# Altium PCB slave.PcbDoc (part 7 of 8)
Units mm, origin at the board's own origin, x right, y up, seen from the top; angles counter-clockwise.
Board outline 160 x 100 mm, 6 copper layers (Top, FUSED_VBAT-, Signals1, Signals2, SUPPLY, Bottom), stack 1.67 mm thick; 597 components, 381 nets, 1695 pads, 3029 vias.
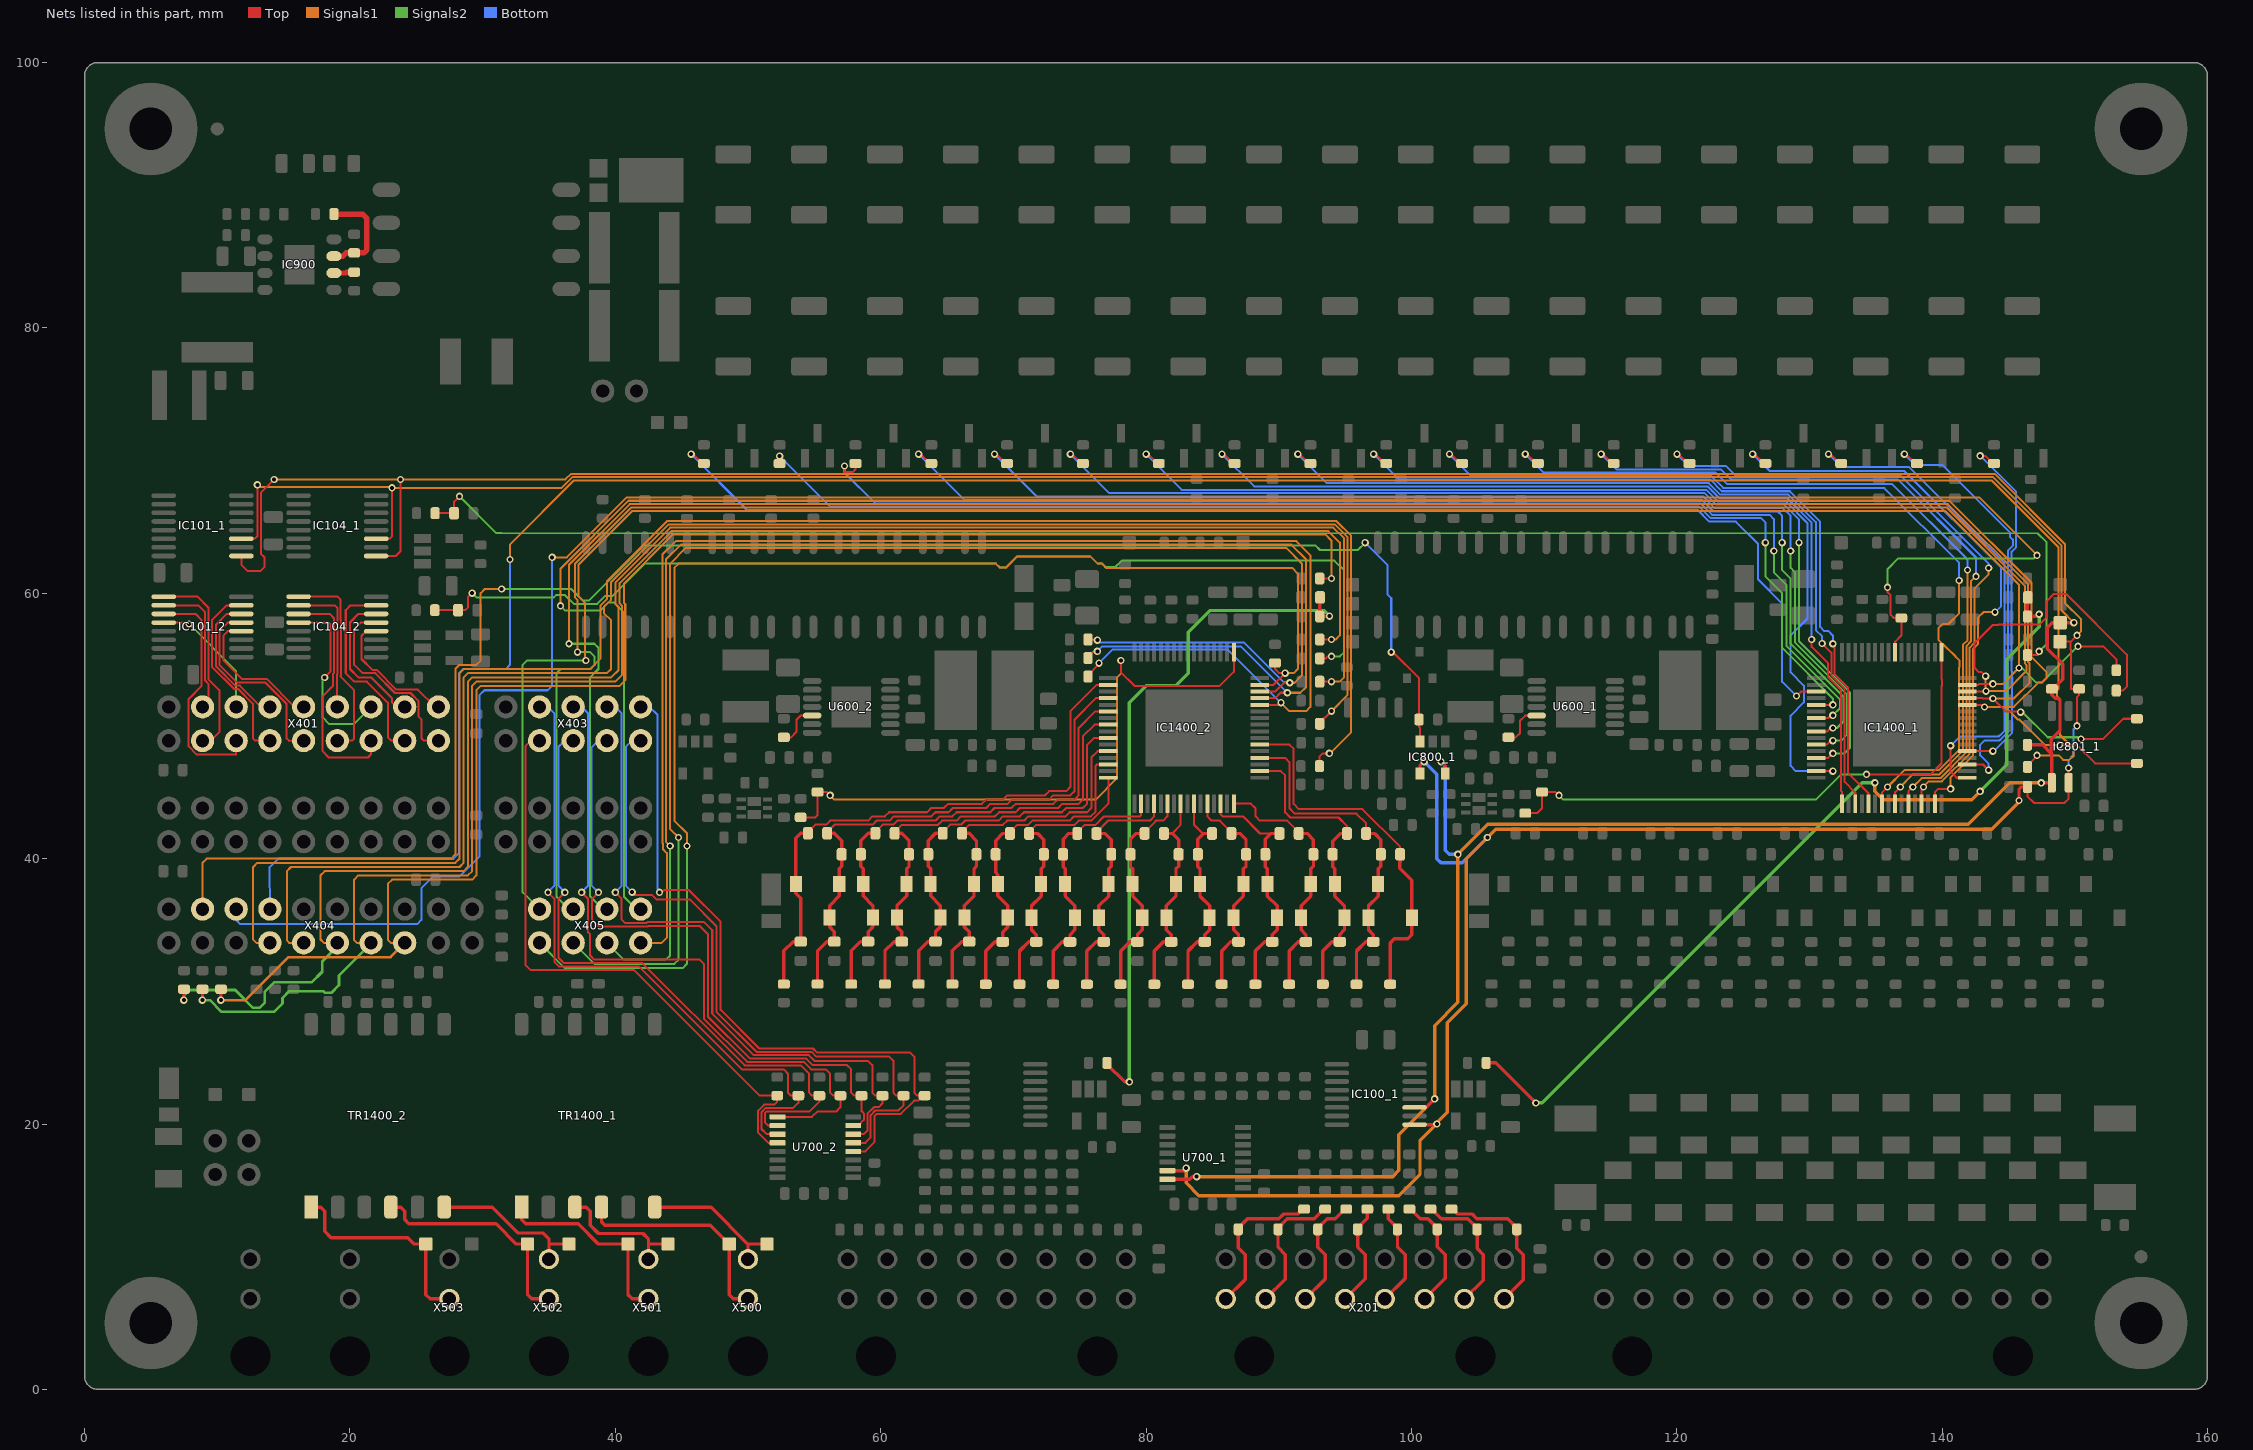
[diagram p10: the nets of this part, all layers, seen from the top]

## Via types
v1: diameter 0.55, hole 0.3, Top to Bottom, tented both sides, 2991 vias
v2: diameter 0.75, hole 0.5, Top to Bottom, tented both sides, 22 vias
v3: diameter 0.65, hole 0.4, Top to Bottom, tented both sides, 16 vias

## Nets (pads, with @x,y where several pads share a name; then routed paths per layer and width w, separated by ;. In a path a pad name is that pad's centre, name@x,y a point inside that pad or via, vN(x,y) a via of type N, cw(c..) or ccw(c..) an arc to the next point about the centre after c; other vN are vias at no path point) (continued)
PRIMARY-GPIO5-OPT: R1416_1.1 X404.13 | length 185.9
  Top w0.152: R1416_1.1@146.433,46.915 146.433,47.015 147.161,47.744 v1(147.161,47.784)
  Signals1 w0.152: v1(32.067,62.547) 32.067,63.691 36.876,68.499 143.748,68.499 148.76,63.487 148.76,52.77 148.671,52.681 148.671,52.221 148.887,52.005 148.887,49.318 149.906,48.299 149.843,48.299 149.906,48.236 149.906,47.776 149.582,47.452 149.122,47.452 148.79,47.784 v1(147.161,47.784)
  Bottom w0.152: X404.13@13.97,36.195 13.95,39.358 14.585,39.993 27.801,39.993 28.237,40.429 28.237,53.963 28.555,54.28 31.73,54.28 32.047,54.597 v1(32.067,62.547)
PRIMARY-GPIO6: IC1400_1.44 R1421_1.1 X405.1 | length 173.1
  Top w0.152: IC1400_1.44@141.958,51.598 143.03,51.598 v1(143.192,51.435) ; v1(148.844,48.578) 150.135,48.578 151.534,47.179 R1421_1.1@154.686,47.179
  Signals2 w0.152: v1(35.877,59.055) 36.241,58.691 38.857,58.691 39.458,59.292 39.917,59.292 40.64,58.569 40.64,37.148 41.593,36.195 X405.1@41.91,36.195
  Signals1 w0.152: v1(35.877,59.055) 35.877,61.869 40.984,66.975 140.548,66.975 146.746,60.778 146.746,55.186 147.854,54.078 147.854,53.618 147.53,53.294 147.272,53.294 145.414,51.435 144.748,51.435 ; v1(143.192,51.435) 144.748,51.435 ; v1(148.844,48.578) 147.744,48.578 145.832,50.49 145.693,50.49 144.748,51.435
PRIMARY-GPIO7: IC1400_1.45 R1422_1.1 X405.3 | length 168.9
  Top w0.152: IC1400_1.45@141.908,52.097 143.061,52.097 143.088,52.071 143.547,52.071 ; IC1400_1.45@141.958,52.097 IC1400_1.45@141.984,52.071 ; 143.548,52.071 v1@143.826,52.071 ; v1(143.827,52.07) 144.792,51.106 145.627,51.106 145.806,50.927 v1(145.923,51.044) ; v1(150.475,49.022) 152.148,49.022 153.67,50.544 R1422_1.1@154.686,50.544
  Signals2 w0.152: v1(36.512,56.197) 38.417,56.197 38.735,55.88 38.735,54.292 38.1,53.657 38.1,37.148 39.052,36.195 X405.3@39.37,36.195 ; v1(145.923,51.044) 146.062,51.044 147.957,49.149 150.348,49.149 v1(150.475,49.022)
  Signals1 w0.152: v1(36.512,56.197) 36.512,62.145 41.089,66.721 140.443,66.721 146.492,60.673 146.492,54.821 146.604,54.708 146.604,53.259 145.415,52.07 v1(143.827,52.07)
PRIMARY-GPIO8: IC1400_1.46 R1423_1.1 X405.5 | length 178.4
  Top w0.152: IC1400_1.46@141.958,52.598 143.29,52.598 v1(143.317,52.625) ; v1(143.29,53.751) 142.985,54.056 142.772,54.056 142.448,54.38 142.448,56.237 143.823,57.612 144.248,57.612 144.269,57.633 147.317,57.633 147.874,58.19 147.874,59.394 148.425,59.944 149.35,59.944 153.924,55.37 153.924,52.959 153.63,52.665 R1423_1.1@153.132,52.665
  Signals2 w0.152: X405.5@36.83,36.195 36.512,36.195 35.56,37.148 35.56,53.975 35.877,54.292 38.1,54.292 38.417,54.61 38.417,55.245 38.1,55.562 v1(37.148,55.562)
  Signals1 w0.152: v1(37.148,55.562) 37.148,59.499 36.974,59.673 36.974,62.247 41.194,66.467 140.338,66.467 146.238,60.568 146.238,54.716 146.35,54.603 146.35,54.143 144.832,52.625 v1(143.317,52.625) ; v1@143.29,52.598 143.29,52.934 143.273,52.951 143.273,53.41 143.29,53.427 v1(143.29,53.751)
PRIMARY-GPIO9: IC1400_1.47 R1424_1.1 X405.7 | length 164.7
  Top w0.152: IC1400_1.47@141.908,53.097 142.709,53.097 142.792,53.18 v1(143.827,53.18) ; v1(150.241,56.007) 152.144,56.007 153.132,55.019 R1424_1.1@153.132,54.199
  Signals2 w0.152: X405.7@34.29,36.195 33.02,37.465 33.02,54.61 33.337,54.927 v1(37.782,54.927) ; v1(145.796,54.373) 145.991,54.373 147.07,53.294 147.53,53.294 150.241,56.005 v1(150.241,56.007)
  Signals1 w0.152: v1(37.782,54.927) 37.702,55.008 37.702,59.304 37.228,59.778 37.228,62.142 41.299,66.213 140.232,66.213 145.796,60.65 v1(145.796,54.373) 144.603,53.18 v1(143.827,53.18)
PRIMARY-IN+: TP1405_1.1 TR1400_1.4 X500.1 | length 16.8
  Top w0.254: TR1400_1.4@38.961,13.738 38.961,12.633 39.211,12.383 47.161,12.383 TP1405_1.1@48.59,10.954 48.59,7.131 48.903,6.818 X500.1@50,6.818
PRIMARY-IN-: TP1404_1.1 TR1400_1.6 X500.2 | length 10.7
  Top w0.254: TR1400_1.6@43.068,13.738 47.216,13.738 50,10.954 ; X500.2@50,9.815 50,10.954 ; TP1404_1.1@51.435,10.954 50,10.954
PRIMARY-LTC-DRIVE: IC1400_1.49 R605_1.1 R610_1.2 | length 42.6
  Top w0.152: R605_1.1@108.585,43.432 109.472,43.432 109.855,43.815 R610_1.2@109.855,45.02 110.872,45.02 v1(111.125,44.767) ; v1(134.302,46.355) 139.14,46.355 139.958,47.173 139.958,52.981 140.012,53.035 140.012,53.495 139.958,53.549 IC1400_1.49@139.958,55.547 ; IC1400_1.49@139.958,55.598 IC1400_1.49@139.993,55.562
  Signals2 w0.152: v1(111.125,44.767) 111.443,44.45 111.76,44.45 130.493,44.45 132.398,46.355 v1(134.302,46.355)
PRIMARY-MUX-DATA_TEMP: C106_1.2 R108_1.2 R1409_1.1 | length 67.2
  Top w0.254: R108_1.2@105.634,24.606 106.362,24.606 v1(109.379,21.59) ; R1409_1.1@146.433,58.261 146.433,59.088 146.457,59.113 C106_1.2@146.457,59.69 ; R1409_1.1@146.483,58.261 147.154,58.261 147.173,58.281 v1(147.32,58.42)
  Signals2 w0.254: v1(109.379,21.59) 109.855,21.59 133.985,45.72 v1(134.938,45.72) ; v1(142.875,45.077) 144.882,47.084 144.882,55.029 147.32,57.468 v1(147.32,58.42)
  Signals1 w0.254: v1(134.938,45.72) 134.938,45.085 135.572,44.45 142.248,44.45 v1(142.875,45.077)
PRIMARY-MUX-DATA_USER: C107_1.2 R109_1.2 R1411_1.1 | length 133.5
  Top w0.152: R109_1.2@26.417,66.04 C107_1.2@27.85,66.04 27.85,66.903 v1(28.258,67.31) ; R1411_1.1@146.433,55.34 147.192,55.34 147.32,55.468 v1(147.32,55.626)
  Signals2 w0.152: v1(28.258,67.31) 31.039,64.528 31.432,64.528 147.191,64.516 147.874,63.833 147.874,56.18 v1(147.32,55.626)
PRIMARY-OUT+: TP1406_1.1 TR1400_1.1 X501.1 | length 15.2
  Top w0.254: TR1400_1.1@32.941,13.738 32.941,12.779 33.235,12.485 37.204,12.485 38.735,10.954 TP1406_1.1@40.957,10.954 40.957,7.144 41.283,6.818 X501.1@42.5,6.818
PRIMARY-OUT-: TP1407_1.1 TR1400_1.3 X501.2 | length 10.4
  Top w0.254: TR1400_1.3@37.048,13.434 37.048,13.738 37.809,13.738 38.112,13.434 38.112,12.37 38.735,11.747 42.088,11.747 42.5,11.335 42.5,10.954 ; X501.2@42.5,9.815 42.5,10.954 ; TP1407_1.1@43.974,10.954 42.5,10.954
PRIMARY-S1: IC1400_1.37 R1517.2 | length 27.4
  Top w0.152: IC1400_1.37@141.958,48.097 143.824,48.097 v1(143.827,48.101) ; v1(142.875,70.358) 143.245,70.358 143.818,69.785 R1517.2@143.918,69.785 ; R1517.2@144.045,69.785 R1517.2@144.145,69.785
  Bottom w0.152: v1(142.875,70.358) 145.588,67.645 145.588,63.483 145.242,63.136 145.242,54.143 145.287,54.098 145.287,49.487 143.901,48.101 v1(143.827,48.101)
PRIMARY-S2: IC1400_1.35 R1516.2 | length 33.4
  Top w0.152: v1(137.16,70.485) 137.313,70.485 138.013,69.785 R1516.2@138.112,69.785 ; IC1400_1.35@141.908,47.097 143.085,47.097 v1(143.51,46.672)
  Bottom w0.152: v1(137.16,70.485) 137.958,69.687 140.017,69.687 145.115,64.59 145.115,64.267 145.334,64.047 145.334,63.588 144.953,63.207 144.953,49.513 144.399,48.959 144.336,48.959 144.336,48.895 143.192,48.895 142.875,48.578 142.875,47.784 143.51,47.149 v1(143.51,46.672)
PRIMARY-S3: IC1400_1.33 R1515.2 | length 38.5
  Top w0.152: v1(131.445,70.485) 131.598,70.485 132.298,69.785 R1515.2@132.398,69.785 ; v1(140.653,48.509) 140.653,46.551 141.106,46.097 IC1400_1.33@141.908,46.097
  Bottom w0.152: v1(131.445,70.485) 132.398,69.532 137.477,69.532 144.699,62.311 144.699,49.618 144.375,49.293 144.294,49.293 144.294,49.212 141.356,49.212 v1(140.653,48.509)
PRIMARY-S4: IC1400_1.31 R1514.2 | length 44.5
  Top w0.152: v1(125.73,70.485) 125.883,70.485 126.583,69.785 R1514.2@126.682,69.785 ; IC1400_1.31@139.457,44.097 139.457,45.001 139.721,45.265 v1(140.653,45.265)
  Signals1 w0.152: v1(140.653,45.265) 140.653,46.125 142.335,47.807 142.335,55.806 142.716,56.187 142.716,58.179 143.122,58.584 143.981,58.584 v1(143.986,58.579)
  Bottom w0.152: v1(125.73,70.485) 127,69.215 137.16,69.215 144.445,61.93 144.445,59.038 v1(143.986,58.579)
PRIMARY-S5: IC1400_1.29 R1513.2 | length 48.9
  Top w0.152: v1(120.015,70.485) 120.168,70.485 120.868,69.785 R1513.2@120.968,69.785 ; IC1400_1.29@138.457,44.097 138.457,45.265 v1(138.595,45.402)
  Signals1 w0.152: v1(138.595,45.402) 139.012,45.819 139.988,45.819 142.081,47.913 142.081,55.911 142.43,56.261 142.43,60.357 143.51,61.436 v1(143.51,61.912)
  Bottom w0.152: v1(120.015,70.485) 120.903,69.597 123.709,69.597 124.409,68.897 136.835,68.897 143.51,62.223 v1(143.51,61.912)
PRIMARY-S6: IC1400_1.27 R1512.2 | length 54.2
  Top w0.152: v1(114.303,70.485) 114.453,70.485 115.153,69.785 R1512.2@115.252,69.785 ; IC1400_1.27@137.458,44.147 137.458,45.065 v1(137.795,45.402)
  Signals1 w0.152: v1(137.795,45.402) 138.466,46.073 139.883,46.073 141.827,48.018 141.827,56.017 142.177,56.366 142.177,60.896 v1(142.558,61.277)
  Bottom w0.152: v1(114.303,70.485) 115.445,69.343 123.329,69.343 124.091,68.581 131.446,68.581 131.447,68.58 136.674,68.58 142.558,62.697 v1(142.558,61.277)
PRIMARY-S7: IC1400_1.25 R1535.2 | length 59.8
  Top w0.152: v1(108.585,70.485) 108.738,70.485 109.438,69.785 R1535.2@109.537,69.785 ; IC1400_1.25@136.457,44.097 136.457,45.017 136.467,45.017 v1(136.852,45.402)
  Signals1 w0.152: v1(136.852,45.402) 137.805,46.355 139.805,46.355 141.573,48.123 141.573,56.122 141.922,56.471 v1(141.922,61.754)
  Bottom w0.152: v1(108.585,70.485) 109.981,69.089 122.936,69.089 123.775,68.25 136.22,68.25 141.922,62.547 v1(141.922,61.754)
PRIMARY-S8: IC1400_1.23 R1534.2 | length 66.8
  Top w0.152: v1(102.87,70.485) 103.023,70.485 103.723,69.785 R1534.2@103.822,69.785 ; IC1400_1.23@135.457,44.097 135.457,44.97 v1(135.89,45.402)
  Signals1 w0.152: v1(135.89,45.402) 137.16,46.672 139.763,46.672 141.287,48.197 141.287,54.417 141.319,54.449 141.319,54.908 141.019,55.208 141.019,55.238 140.44,55.816 140.411,55.816 139.717,56.51 139.717,57.36 140.042,57.684 140.483,57.684 141.287,58.489 v1(141.287,60.96)
  Bottom w0.152: v1(102.87,70.485) 104.52,68.835 122.617,68.835 123.507,67.945 130.822,67.945 130.835,67.933 135.656,67.933 141.287,62.301 v1(141.287,60.96)
PRIMARY-S9: IC1400_1.21 R1533.2 | length 60
  Top w0.152: v1(97.155,70.485) 97.308,70.485 98.008,69.785 R1533.2@98.108,69.785 ; v1(131.762,56.197) 131.903,56.057 131.903,53.913 132.905,52.91 132.905,46.482 134.457,44.93 IC1400_1.21@134.457,44.097
  Bottom w0.152: v1(97.155,70.485) 99.059,68.581 122.512,68.581 123.402,67.691 128.524,67.691 130.81,65.405 130.81,57.468 131.127,57.15 131.445,57.15 131.777,56.818 131.777,56.212 v1(131.762,56.197)
PRIMARY-S10: IC1400_1.19 R1532.2 | length 64.9
  Top w0.152: v1(91.44,70.485) 91.593,70.485 92.293,69.785 R1532.2@92.392,69.785 ; v1(130.964,56.212) 131.649,55.527 131.649,53.807 132.651,52.805 132.651,45.783 133.457,44.978 IC1400_1.19@133.457,44.097
  Bottom w0.152: v1(91.44,70.485) 93.616,68.309 122.425,68.309 123.297,67.437 128.419,67.437 130.493,65.363 130.493,57.226 130.964,56.755 v1(130.964,56.212)
PRIMARY-S11: IC1400_1.17 R1531.2 | length 70
  Top w0.152: v1(85.725,70.485) 85.878,70.485 86.578,69.785 R1531.2@86.677,69.785 ; v1(130.175,56.515) 130.175,55.971 131.395,54.751 131.395,53.702 132.398,52.7 132.398,45.085 132.457,45.025 IC1400_1.17@132.457,44.097
  Bottom w0.152: v1(85.725,70.485) 88.155,68.055 122.32,68.055 123.192,67.183 128.314,67.183 130.175,65.322 v1(130.175,56.515)
PRIMARY-S12: IC1400_1.15 R1530.2 | length 77.5
  Top w0.152: v1(80.01,70.485) 80.163,70.485 80.863,69.785 R1530.2@80.962,69.785 ; IC1400_1.15@130.457,46.598 v1(131.762,46.598)
  Bottom w0.152: v1(80.01,70.485) 82.694,67.801 122.215,67.801 123.087,66.929 128.208,66.929 129.857,65.28 129.857,58.102 128.588,56.832 128.588,54.038 129.586,53.04 129.586,51.774 128.588,50.775 128.588,46.99 128.98,46.598 v1(131.762,46.598)
PRIMARY-S13: IC1400_1.13 R1553.2 | length 79.9
  Top w0.152: v1(74.295,70.485) 74.448,70.485 75.148,69.785 R1553.2@75.248,69.785 ; IC1400_1.13@130.457,47.598 131.418,47.598 v1(131.762,47.942)
  Signals2 w0.152: v1(129.222,63.817) 129.222,56.366 133.079,52.51 133.079,48.375 132.646,47.942 v1(131.762,47.942)
  Bottom w0.152: v1(74.295,70.485) 77.233,67.547 122.11,67.547 122.981,66.675 128.103,66.675 129.222,65.556 v1(129.222,63.817)
PRIMARY-S14: IC1400_1.11 R1552.2 | length 84.1
  Top w0.152: v1(68.58,70.485) 68.733,70.485 69.433,69.785 R1552.2@69.532,69.785 ; IC1400_1.11@130.457,48.598 131.306,48.598 131.604,48.895 v1(131.762,48.895)
  Signals2 w0.152: v1(128.588,63.182) 128.588,61.912 128.905,61.595 128.905,56.324 132.825,52.404 132.825,49.322 132.398,48.895 v1(131.762,48.895)
  Bottom w0.152: v1(68.58,70.485) 71.772,67.293 122.004,67.293 122.876,66.421 127.998,66.421 128.588,65.831 v1(128.588,63.182)
PRIMARY-S15: IC1400_1.9 R1551.2 | length 88.1
  Top w0.152: v1(62.865,70.485) 63.018,70.485 63.718,69.785 R1551.2@63.817,69.785 ; IC1400_1.9@130.457,49.598 131.354,49.598 131.604,49.847 v1(131.762,49.847)
  Signals2 w0.152: v1(127.953,63.817) 127.953,61.744 128.588,61.109 128.588,56.197 132.571,52.214 132.571,50.338 132.08,49.847 v1(131.762,49.847)
  Bottom w0.152: v1(62.865,70.485) 66.311,67.039 121.899,67.039 122.771,66.167 127.635,66.167 127.953,65.849 v1(127.953,63.817)
PRIMARY-S16: IC1400_1.7 R1550.2 | length 92.3
  Top w0.152: v1(57.277,69.596) 57.277,69.151 57.921,69.151 58.102,69.333 R1550.2@58.102,69.785 ; IC1400_1.7@130.457,50.598 131.401,50.598 131.604,50.8 v1(131.762,50.8)
  Signals2 w0.152: v1(127.317,63.182) 127.317,61.595 128.27,60.642 128.27,56.039 132.317,51.992 132.317,51.354 v1(131.762,50.8)
  Bottom w0.152: v1(57.277,69.596) 57.277,69.088 59.58,66.785 121.794,66.785 122.666,65.913 127,65.913 127.317,65.596 v1(127.317,63.182)
PRIMARY-S17: IC1400_1.5 R1549.2 | length 94.1
  Top w0.152: R1549.2@52.387,69.785 v1(52.387,70.34) ; IC1400_1.5@130.457,51.598 131.759,51.598 v1(131.762,51.594)
  Signals2 w0.152: v1(126.682,63.817) 126.682,61.277 127.953,60.008 127.953,55.88 131.762,52.07 v1(131.762,51.594)
  Bottom w0.152: v1(52.387,70.34) 56.196,66.531 121.689,66.531 122.561,65.659 126.365,65.659 126.682,65.341 v1(126.682,63.817)
PRIMARY-S18: IC1400_1.3 R1548.2 | length 98.7
  Top w0.152: v1(45.72,70.485) 45.873,70.485 46.573,69.785 R1548.2@46.672,69.785 ; v1(129.032,52.254) 129.376,52.598 IC1400_1.3@130.457,52.598
  Bottom w0.152: v1(45.72,70.485) 49.928,66.277 121.584,66.277 122.455,65.405 124.46,65.405 126.128,63.737 126.128,61.048 127.953,59.223 127.953,53.333 v1(129.032,52.254)
PRIMARY-SCL: IC100_1.1 IC101_1.1 IC104_1.1 IC800_1.4 IC801_1.6 R1417_1.1 R1420_1.1 TP1409_1.1 U700_1.14 | length 287.4
  Top w0.152: IC101_1.1@11.786,62.801 IC101_1.1@11.815,62.801 ; IC101_1.1@11.815,62.813 IC101_1.1@11.815,62.801 ; v1(14.287,68.58) 13.886,68.178 13.889,68.175 13.283,67.568 13.283,62.984 13.572,62.695 13.572,62 13.247,61.676 12.3,61.676 11.815,62.161 IC101_1.1@11.815,62.801 ; IC104_1.1@21.946,62.801 IC104_1.1@21.975,62.801 ; IC104_1.1@21.975,62.813 23.443,62.813 23.812,63.182 v1(23.812,68.58) ; R1417_1.1@146.433,45.402 146.433,44.702 146.939,44.196 149.225,44.196 149.542,44.514 IC801_1.6@149.542,45.719 v1(149.542,46.831) ; TP1409_1.1@148.887,56.356 149.701,56.356 ; v1(150.177,50.006) 150.177,52.188 150.336,52.347 R1420_1.1@150.336,52.799 149.701,52.799 149.701,55.763 149.687,55.777 149.687,56.342 149.701,56.356 ; v1(150.177,56.832) 149.701,56.356
  Top w0.254: U700_1.14@81.605,16.488 82.845,16.488 v1(83.026,16.669) ; IC100_1.1@100.239,19.95 101.865,19.95 v1(101.917,20.002) ; IC800_1.4@100.65,46.425 100.65,46.993 v1(100.965,47.307) ; v1(145.8,44.379) 145.8,45.222 145.981,45.402 R1417_1.1@146.433,45.402
  Signals1 w0.152: v1(14.287,68.58) v1(23.812,68.58) 36.238,68.58 36.666,69.007 143.958,69.007 149.268,63.697 149.268,59.244 150.484,58.028 150.484,57.139 v1(150.177,56.832)
  Signals1 w0.254: v1(83.026,16.669) 83.026,15.557 83.979,14.605 99.06,14.605 100.647,16.192 100.647,18.732 v1(101.917,20.002) 101.917,20.099 102.711,20.893 102.711,27.622 104.14,29.051 104.14,40.005 v1(105.727,41.593) 106.362,42.227 106.68,42.227 143.736,42.227 145.8,44.291 v1(145.8,44.379)
  Bottom w0.152: v1(149.542,46.831) 149.542,47.412 149.906,47.776 149.906,49.735 v1(150.177,50.006)
  Bottom w0.254: v1(100.965,47.307) 101.917,46.355 101.917,40.005 102.235,39.688 103.822,39.688 v1(105.727,41.593)
PRIMARY-SDA: IC100_1.3 IC101_1.3 IC104_1.3 IC800_1.5 IC801_1.5 R1415_1.1 R1419_1.1 TP1408_1.1 U700_1.15 | length 273.4
  Top w0.152: IC101_1.3@11.815,64.113 12.842,64.113 13.018,64.288 v1(13.018,68.178) ; IC104_1.3@21.975,64.113 23.002,64.113 23.177,64.288 v1(23.177,67.945)
  Top w0.254: U700_1.15@81.605,15.838 83.306,15.838 83.502,16.034 v1(83.82,16.034) ; IC100_1.3@100.239,21.25 101.109,21.25 v1(101.759,21.9) ; v1(102.235,47.307) 102.55,46.992 IC800_1.5@102.55,46.425 ; R1415_1.1@146.433,48.578 147.574,48.578 148.239,47.913 ; v1(147.476,45.719) IC801_1.5@148.273,45.719 148.273,47.879 148.239,47.913 ; v1(149.93,57.785) TP1408_1.1@148.907,57.785 148.306,57.785 147.935,57.414 147.935,55.836 149.098,54.673 149.098,53.524 148.372,52.799 R1419_1.1@148.273,52.799 148.273,52.347 148.522,52.097 148.723,52.097 148.887,51.933 148.887,49.634 148.239,48.985 148.239,47.913
  Signals1 w0.152: v1(13.018,68.178) 13.17,68.026 23.097,68.026 v1(23.177,67.945) 35.963,67.945 36.771,68.753 143.853,68.753 149.014,63.592 149.014,58.7 v1(149.93,57.785)
  Signals1 w0.254: v1(83.82,16.034) 98.584,16.034 99.06,16.51 99.06,19.201 v1(101.759,21.9) 101.759,27.416 103.505,29.163 v1(103.505,40.322) 105.766,42.583 106.68,42.583 141.961,42.583 145.096,45.719 v1(147.476,45.719)
  Bottom w0.254: v1(102.235,47.307) 102.552,46.99 102.552,40.64 102.87,40.322 v1(103.505,40.322)
PRIMARY-T-SENSOR_0: R107_1.1 R112_1.2 X201.1 | length 11.6
  Top w0.254: R112_1.2@103.029,13.588 103.129,13.588 103.499,13.217 104.576,13.217 104.934,12.859 107.255,12.859 107.953,12.161 R107_1.1@107.953,12.061 107.953,10.633 108.426,10.16 108.426,8.254 X201.1@106.99,6.818
PRIMARY-T-SENSOR_1: R106_1.1 R113_1.2 X201.2 | length 10.2
  Top w0.254: R113_1.2@101.441,13.588 101.541,13.588 102.27,12.859 104.255,12.859 104.953,12.161 R106_1.1@104.953,12.061 104.953,10.617 105.41,10.16 105.41,8.235 X201.2@103.993,6.818
PRIMARY-T-SENSOR_2: R105_1.1 R114_1.2 X201.3 | length 8.9
  Top w0.254: R114_1.2@99.854,13.588 99.954,13.588 100.683,12.859 101.255,12.859 101.953,12.161 R105_1.1@101.953,12.061 101.953,10.759 102.552,10.16 102.552,8.374 X201.3@100.996,6.818
PRIMARY-T-SENSOR_3: R104_1.1 R115_1.2 X201.4 | length 7.9
  Top w0.254: X201.4@97.999,6.818 99.536,8.355 99.536,10.16 98.953,10.743 R104_1.1@98.953,12.061 98.953,12.161 98.266,12.848 R115_1.2@98.266,13.588
PRIMARY-T-SENSOR_4: R103_1.1 R116_1.2 X201.5 | length 7.9
  Top w0.254: X201.5@95.001,6.818 96.52,8.337 96.52,10.16 95.953,10.727 R103_1.1@95.953,12.061 95.953,12.161 96.679,12.886 R116_1.2@96.679,13.588
PRIMARY-T-SENSOR_5: R102_1.1 R117_1.2 X201.6 | length 8.9
  Top w0.254: X201.6@92.004,6.818 93.504,8.318 93.504,10.16 92.953,10.711 R102_1.1@92.953,12.061 92.953,12.161 93.651,12.859 94.262,12.859 94.991,13.588 R117_1.2@95.091,13.588
PRIMARY-T-SENSOR_6: R101_1.1 R118_1.2 X201.7 | length 10.3
  Top w0.254: X201.7@89.007,6.818 90.487,8.299 90.487,10.16 89.953,10.694 R101_1.1@89.953,12.061 89.953,12.161 90.651,12.859 92.675,12.859 93.404,13.588 R118_1.2@93.504,13.588
PRIMARY-T-SENSOR_7: R100_1.1 R119_1.2 X201.8 | length 11.7
  Top w0.254: X201.8@86.01,6.818 87.471,8.279 87.471,10.16 86.953,10.678 R100_1.1@86.953,12.061 86.953,12.161 87.651,12.859 90.011,12.859 90.369,13.217 91.446,13.217 91.816,13.588 R119_1.2@91.916,13.588
PRIMARY-TEMP-ALERT: IC800_1.3 R800_1.1 X404.17 | length 130.1
  Top w0.152: v1(98.485,55.562) 98.614,55.562 100.582,53.594 R800_1.1@100.582,50.482 100.582,49.931 100.65,49.863 IC800_1.3@100.65,48.825
  Signals2 w0.152: v1(31.432,60.325) 36.681,60.325 37.553,59.453 38.012,59.453 42.169,63.61 92.769,63.61 93.115,63.263 95.966,63.263 v1(96.52,63.817)
  Signals1 w0.152: X404.17@8.89,36.195 8.89,39.688 9.207,40.005 27.622,40.005 27.94,40.322 27.94,54.292 28.258,54.61 29.527,54.61 29.845,54.927 29.845,60.008 30.162,60.325 v1(31.432,60.325)
  Bottom w0.152: v1(96.52,63.817) 98.188,62.149 98.188,59.927 98.485,59.63 v1(98.485,55.562)
PRIMARY-WDT: IC1400_1.56 R1404_1.1 X404.15 | length 184.9
  Top w0.152: v1(135.89,60.452) 135.89,60.092 136.124,59.859 136.124,58.38 136.136,58.38 136.378,58.137 R1404_1.1@136.93,58.137 136.93,56.821 136.458,56.349 IC1400_1.56@136.458,55.547
  Signals2 w0.152: v1(135.89,60.452) 135.89,61.821 136.694,62.626 146.922,62.626 v1(147.161,62.865)
  Signals1 w0.152: v1(35.242,62.706) 36.355,62.706 40.879,67.229 142.797,67.229 v1(147.161,62.865)
  Bottom w0.152: X404.15@11.43,36.195 11.41,35.389 11.727,35.071 25.062,35.071 25.38,35.389 25.38,37.77 26.269,38.659 28.263,38.659 29.761,40.157 29.761,52.312 30.142,52.693 34.905,52.693 35.222,53.01 35.242,53.03 v1(35.242,62.706)
R_FB: IC900.6 R904.1 | length 1.6
  Top w0.406: IC900.6@18.794,84.138 19.703,84.138 19.768,84.203 R904.1@20.32,84.203
R_REF: IC900.7 R902.2 R905.2 | length 7.7
  Top w0.406: IC900.7@18.794,85.407 19.467,85.407 19.72,85.66 R902.2@20.32,85.66 21.06,85.66 21.273,85.873 21.273,88.265 20.955,88.582 R905.2@18.797,88.582
RON_1: R600_1.1 U600_1.5 | length 3.4
  Top w0.152: R600_1.1@107.315,49.147 107.867,49.147 108.186,49.467 108.186,50.401 108.57,50.785 U600_1.5@109.445,50.785
RON_2: R600_2.1 U600_2.5 | length 3.4
  Top w0.152: R600_2.1@52.705,49.147 53.257,49.147 53.657,49.548 53.657,50.482 53.96,50.785 U600_2.5@54.835,50.785
SECONDARY-ANALOG-IN_0: IC104_2.4 X401.1 | length 10.3
  Top w0.152: IC104_2.4@21.975,57.143 21.225,57.143 20.872,56.79 20.872,55.046 21.69,54.229 22.013,54.229 23.5,52.742 25.116,52.742 26.422,51.435 X401.1@26.67,51.435
SECONDARY-ANALOG-IN_1: IC104_2.5 X401.2 | length 14.8
  Top w0.152: IC104_2.5@21.975,57.793 20.804,57.793 20.32,57.309 20.32,54.61 20.955,53.975 21.907,53.975 23.395,52.488 24.566,52.488 25.183,51.871 25.183,50.7 25.4,50.482 25.4,49.054 25.559,48.895 X401.2@26.67,48.895
SECONDARY-ANALOG-IN_2: IC104_2.6 X401.3 | length 11.2
  Top w0.152: IC104_2.6@21.975,58.443 20.647,58.443 20.002,57.798 20.002,54.292 20.637,53.657 21.59,53.657 23.177,52.07 23.177,51.752 23.495,51.435 X401.3@24.13,51.435
SECONDARY-ANALOG-IN_3: IC104_2.7 X401.4 | length 15.2
  Top w0.152: IC104_2.7@21.946,59.093 20.041,59.093 19.685,58.737 19.685,53.975 20.32,53.34 21.273,53.34 22.86,51.752 22.86,49.149 23.114,48.895 X401.4@24.13,48.895
SECONDARY-ANALOG-IN_4: IC104_2.12 X401.5 | length 14.1
  Top w0.152: IC104_2.12@16.125,57.793 18.407,57.793 18.55,57.65 18.55,54.11 v1(18.098,53.657)
  Signals2 w0.152: v1(18.098,53.657) 17.939,53.499 17.939,50.641 18.415,50.165 20.32,50.165 X401.5@21.59,51.435
SECONDARY-ANALOG-IN_5: IC104_2.11 X401.6 | length 18.2
  Top w0.152: IC104_2.11@16.125,58.443 18.463,58.443 18.796,58.109 18.796,57.763 18.804,57.755 18.804,54.005 18.72,53.921 18.72,53.01 17.939,52.229 17.939,48.101 18.415,47.625 21.361,47.625 21.59,47.854 X401.6@21.59,48.895
SECONDARY-ANALOG-IN_6: IC104_2.10 X401.7 | length 10.5
  Top w0.152: IC104_2.10@16.125,59.093 18.854,59.093 19.05,58.896 19.05,57.868 19.058,57.86 19.058,53.9 19.012,53.853 19.012,51.473 X401.7@19.05,51.435
SECONDARY-ANALOG-IN_7: IC104_2.9 X401.8 | length 15.5
  Top w0.152: IC104_2.9@16.125,59.743 19.072,59.743 19.304,59.51 19.304,57.974 19.312,57.966 19.312,53.794 19.304,53.786 19.304,53.721 20.32,52.705 20.32,49.054 20.161,48.895 X401.8@19.05,48.895
SECONDARY-ANALOG-IN_8: IC101_2.4 X401.9 | length 10.9
  Top w0.152: IC101_2.4@11.815,57.143 10.788,57.143 10.477,56.832 10.477,54.927 11.857,53.548 13.73,53.548 15.855,51.423 X401.9@16.51,51.435
SECONDARY-ANALOG-IN_9: IC101_2.5 X401.10 | length 14.7
  Top w0.152: IC101_2.5@11.815,57.793 10.788,57.793 10.16,57.164 10.16,54.61 11.476,53.294 13.6,53.294 15.22,51.674 15.22,49.074 15.413,48.881 X401.10@16.51,48.895
SECONDARY-ANALOG-IN_10: IC101_2.6 X401.11 | length 10.7
  Top w0.152: IC101_2.6@11.815,58.443 10.71,58.443 9.906,57.639 9.906,54.505 11.371,53.04 11.698,53.04 13.315,51.423 X401.11@13.97,51.435
SECONDARY-ANALOG-IN_11: IC101_2.7 X401.12 | length 14.4
  Top w0.152: IC101_2.7@11.786,59.093 10.71,59.093 9.588,57.971 9.588,54.463 11.266,52.786 11.568,52.786 12.68,51.674 12.68,49.074 12.859,48.895 X401.12@13.97,48.895
SECONDARY-ANALOG-IN_12: IC101_2.12 X401.13 | length 9.7
  Top w0.152: IC101_2.12@5.965,57.793 7.772,57.793 v1(7.874,57.691)
  Signals2 w0.152: v1(7.874,57.691) 11.43,54.135 X401.13@11.43,51.435
SECONDARY-ANALOG-IN_13: IC101_2.11 X401.14 | length 17.9
  Top w0.152: IC101_2.11@5.965,58.443 8.359,58.443 8.826,57.975 8.826,53.023 7.837,52.033 7.837,48.459 8.454,47.842 11.418,47.842 11.43,47.854 X401.14@11.43,48.895
SECONDARY-ANALOG-IN_14: IC101_2.10 X401.15 | length 10.8
  Top w0.152: IC101_2.10@5.994,59.093 8.572,59.093 9.08,58.585 9.08,53.425 9.335,53.171 9.335,51.88 X401.15@8.89,51.435 X401.15@8.852,51.473
SECONDARY-ANALOG-IN_15: IC101_2.9 X401.16 | length 15
  Top w0.152: IC101_2.9@5.965,59.743 8.52,59.743 9.335,58.928 9.335,53.53 10.16,52.705 10.16,49.53 9.525,48.895 X401.16@8.89,48.895
SECONDARY-C0: C1311_2.2 IC1400_2.38 R1306_2.2 Z1305_2.2 | length 28.1
  Top w0.152: IC1400_2.38@88.618,48.598 90.805,48.598 91.123,48.28 91.123,44.133 91.518,43.737 96.312,43.737 99.15,40.899 C1311_2.2@99.15,40.322
  Top w0.254: R1306_2.2@98.405,30.583 98.405,33.643 98.722,33.96 99.722,33.96 100.04,34.278 100.04,38.358 99.13,39.268 99.13,39.726 99.15,39.746 C1311_2.2@99.15,40.322
SECONDARY-C1: C1305_2.1 C1310_2.2 C1311_2.1 IC1400_2.36 R1305_2.2 Z1304_2.2 Z1305_2.1 | length 26.3
  Top w0.152: IC1400_2.36@88.618,47.598 90.487,47.598 90.805,47.28 90.805,43.815 91.222,43.398 95.858,43.398 96.59,42.666 C1310_2.2@96.59,41.898
  Top w0.254: R1305_2.2@95.865,30.533 95.865,33.039 96.558,33.733 C1305_2.1@97.135,33.733 ; C1310_2.2@96.59,41.898 97.223,41.898 97.7,41.42 C1311_2.1@97.7,40.322 97.7,39.436 97.5,39.236 Z1304_2.2@97.5,38.088 97.5,37.183 96.77,36.453 96.77,34.643 97.135,34.278 C1305_2.1@97.135,33.872
SECONDARY-C2: C1304_2.1 C1309_2.2 C1310_2.1 IC1400_2.34 R1304_2.2 Z1303_2.2 Z1304_2.1 | length 23.8
  Top w0.152: IC1400_2.34@88.618,46.598 90.17,46.598 90.487,46.28 90.487,43.497 90.881,43.104 94.51,43.104 95.14,42.474 C1310_2.1@95.14,41.898
  Top w0.254: R1304_2.2@93.325,30.533 93.325,33.039 94.018,33.733 C1304_2.1@94.595,33.733 ; C1304_2.1@94.595,33.872 94.595,34.278 94.96,34.643 94.96,36.453 94.23,37.183 Z1304_2.1@94.23,38.088 94.23,39.236 94.07,39.396 C1309_2.2@94.07,40.322 94.07,41.304 94.663,41.898 C1310_2.1@95.14,41.898
SECONDARY-C3: C1303_2.1 C1308_2.2 C1309_2.1 IC1400_2.32 R1303_2.2 Z1302_2.2 Z1303_2.1 | length 19.6
  Top w0.152: IC1400_2.32@86.618,44.147 87.897,44.147 88.265,43.78 88.265,43.18 88.582,42.862 90.645,42.862 91.51,41.998 C1308_2.2@91.51,41.898
  Top w0.254: R1303_2.2@90.785,30.533 90.785,33.039 91.478,33.733 C1303_2.1@92.055,33.733 ; C1308_2.2@91.65,41.898 92.143,41.898 92.6,41.44 92.6,40.919 92.62,40.899 C1309_2.1@92.62,40.322 92.62,39.436 92.42,39.236 Z1302_2.2@92.42,38.088 92.42,37.183 91.69,36.453 91.69,34.643 92.055,34.278 C1303_2.1@92.055,33.872
SECONDARY-C4: C1302_2.1 C1307_2.2 C1308_2.1 IC1400_2.30 R1302_2.2 Z1301_2.2 Z1302_2.1 | length 18.6
  Top w0.152: IC1400_2.30@85.618,44.147 85.618,43.346 85.783,43.18 87.312,43.18 88.595,41.898 89.428,41.898
  Top w0.254: R1302_2.2@88.245,30.533 88.245,33.039 88.938,33.733 C1302_2.1@89.515,33.733 ; C1302_2.1@89.515,33.872 89.515,34.278 89.88,34.643 89.88,36.453 89.15,37.183 Z1302_2.1@89.15,38.088 89.15,39.236 88.99,39.396 C1307_2.2@88.99,40.322 88.99,41.46 89.428,41.898 C1308_2.1@90.06,41.898
SECONDARY-C5: C1301_2.1 C1306_2.2 C1307_2.1 IC1400_2.28 R1301_2.2 Z1300_2.2 Z1301_2.1 | length 16.6
  Top w0.152: IC1400_2.28@84.618,44.097 84.618,43.18 84.935,42.862 85.565,42.862 86.43,41.998 C1306_2.2@86.43,41.898
  Top w0.254: R1301_2.2@85.705,30.533 85.705,33.039 86.398,33.733 C1301_2.1@86.975,33.733 ; C1306_2.2@86.57,41.898 87.063,41.898 87.54,41.42 C1307_2.1@87.54,40.322 87.54,39.436 87.34,39.236 Z1300_2.2@87.34,38.088 87.34,37.376 87.34,37.183 86.61,36.453 86.61,34.643 86.975,34.278 C1301_2.1@86.975,33.872
SECONDARY-C6: C1300_2.1 C1306_2.1 C1323_2.2 IC1400_2.26 R1300_2.2 Z1300_2.1 Z1311_2.2 | length 15.8
  Top w0.152: IC1400_2.26@83.618,44.097 83.618,42.545 84.265,41.898
  Top w0.254: R1300_2.2@83.165,30.533 83.165,33.039 83.858,33.733 C1300_2.1@84.435,33.733 ; 84.265,41.898 84.348,41.898 ; C1300_2.1@84.435,33.872 84.435,34.278 84.8,34.643 84.8,36.453 84.07,37.183 Z1300_2.1@84.07,38.088 84.07,39.236 83.91,39.396 C1323_2.2@83.91,40.322 83.91,41.46 84.348,41.898 ; C1306_2.1@84.84,41.898 84.348,41.898
SECONDARY-C7: C1317_2.1 C1322_2.2 C1323_2.1 IC1400_2.24 R1312_2.2 Z1310_2.2 Z1311_2.1 | length 15.8
  Top w0.152: 81.97,41.898 82.618,42.545 IC1400_2.24@82.618,44.097
  Top w0.254: R1312_2.2@80.625,30.533 80.625,33.039 81.318,33.733 C1317_2.1@81.895,33.733 ; C1322_2.2@81.49,41.898 81.97,41.898 82.46,41.408 C1323_2.1@82.46,40.322 82.46,39.436 82.26,39.236 Z1310_2.2@82.26,38.088 82.26,37.183 81.53,36.453 81.53,34.643 81.895,34.278 C1317_2.1@81.895,33.872
SECONDARY-C8: C1316_2.1 C1321_2.2 C1322_2.1 IC1400_2.22 R1311_2.2 Z1309_2.2 Z1310_2.1 | length 16.6
  Top w0.152: C1322_2.1@79.76,41.898 C1322_2.1@79.83,41.967 ; C1322_2.1@79.9,41.898 79.9,41.998 80.725,42.823 80.725,42.862 81.3,42.862 81.618,43.18 IC1400_2.22@81.618,44.097
  Top w0.254: R1311_2.2@78.085,30.533 78.085,33.039 78.778,33.733 C1316_2.1@79.355,33.733 ; C1316_2.1@79.355,33.872 79.355,34.278 79.72,34.643 79.72,36.453 78.99,37.183 78.99,37.376 Z1310_2.1@78.99,38.088 78.99,39.236 78.83,39.396 C1321_2.2@78.83,40.322 78.83,41.46 79.268,41.898 C1322_2.1@79.76,41.898
SECONDARY-C9: C1315_2.1 C1320_2.2 C1321_2.1 IC1400_2.20 R1310_2.2 Z1308_2.2 Z1309_2.1 | length 19.2
  Top w0.152: C1320_2.2@76.27,41.898 76.27,41.998 77.135,42.862 80.3,42.862 80.618,43.18 IC1400_2.20@80.618,44.097
  Top w0.254: R1310_2.2@75.545,30.533 75.545,33.039 76.238,33.733 C1315_2.1@76.815,33.733 ; C1320_2.2@76.41,41.898 76.903,41.898 77.38,41.42 C1321_2.1@77.38,40.322 77.38,39.436 77.18,39.236 Z1308_2.2@77.18,38.088 77.18,37.376 77.18,37.183 76.45,36.453 76.45,34.643 76.815,34.278 C1315_2.1@76.815,33.872
SECONDARY-C10: C1314_2.1 C1319_2.2 C1320_2.1 IC1400_2.18 R1309_2.2 Z1307_2.2 Z1308_2.1 | length 19.5
  Top w0.152: C1320_2.1@74.82,41.898 74.82,41.998 75.373,42.55 76.205,42.55 76.835,43.18 79.534,43.18 79.618,43.264 IC1400_2.18@79.618,44.097
  Top w0.254: R1309_2.2@73.005,30.533 73.005,33.039 73.698,33.733 C1314_2.1@74.275,33.733 ; C1314_2.1@74.275,33.872 74.275,34.278 74.64,34.643 74.64,36.453 73.91,37.183 73.91,37.376 Z1308_2.1@73.91,38.088 73.91,39.236 73.75,39.396 C1319_2.2@73.75,40.322 73.75,41.46 74.188,41.898 C1320_2.1@74.68,41.898
SECONDARY-C11: C1313_2.1 C1318_2.2 C1319_2.1 IC1400_2.16 R1308_2.2 Z1306_2.2 Z1307_2.1 | length 22.2
  Top w0.152: C1318_2.2@71.19,41.898 71.19,41.998 71.743,42.55 74.618,42.55 74.93,42.862 75.882,42.862 77.168,44.148 IC1400_2.16@77.168,46.097
  Top w0.254: R1308_2.2@70.465,30.533 70.465,33.039 71.158,33.733 C1313_2.1@71.735,33.733 ; C1318_2.2@71.33,41.898 71.823,41.898 72.3,41.42 C1319_2.1@72.3,40.322 72.3,39.436 72.1,39.236 Z1306_2.2@72.1,38.088 72.1,37.183 71.37,36.453 71.37,34.643 71.735,34.278 C1313_2.1@71.735,33.872
SECONDARY-C12: C1312_2.1 C1318_2.1 C1335_2.2 IC1400_2.14 R1307_2.2 Z1306_2.1 Z1317_2.2 | length 25.1
  Top w0.152: C1318_2.1@69.74,41.898 69.74,41.998 70.293,42.55 71.12,42.55 71.432,42.862 74.253,42.862 74.571,43.18 75.841,43.18 76.2,43.539 76.2,46.99 76.307,47.097 IC1400_2.14@77.117,47.097
  Top w0.254: R1307_2.2@67.925,30.533 67.925,33.039 68.618,33.733 C1312_2.1@69.195,33.733 69.195,34.463 69.58,34.848 Z1317_2.2@69.58,35.56 69.58,36.465 68.83,37.215 68.83,37.376 Z1306_2.1@68.83,38.088 68.83,38.799 68.67,38.959 68.67,40.005 68.67,41.365 69.203,41.898 C1318_2.1@69.74,41.898
SECONDARY-C13: C1329_2.1 C1334_2.2 C1335_2.1 IC1400_2.12 R1318_2.2 Z1316_2.2 Z1317_2.1 | length 29.1
  Top w0.152: C1334_2.2@66.13,41.91 66.13,42.01 66.665,42.545 69.215,42.545 69.532,42.862 70.802,42.862 71.12,43.18 73.936,43.18 74.253,43.497 75.565,43.497 75.882,43.815 75.882,47.625 76.355,48.097 IC1400_2.12@77.117,48.097
  Top w0.254: R1318_2.2@65.405,30.545 65.405,33.052 66.098,33.745 C1329_2.1@66.675,33.745 66.675,34.483 66.31,34.848 Z1317_2.1@66.31,35.56 66.31,36.465 67.04,37.195 67.04,37.388 Z1316_2.2@67.04,38.1 67.04,39.248 67.22,39.428 67.22,40.005 67.22,41.365 66.675,41.91 C1334_2.2@66.358,41.91
SECONDARY-C14: C1328_2.1 C1333_2.2 C1334_2.1 IC1400_2.10 R1317_2.2 Z1315_2.2 Z1316_2.1 | length 31.5
  Top w0.152: C1334_2.1@64.68,41.91 64.68,42.01 65.233,42.563 66.058,42.563 66.358,42.862 68.897,42.862 69.215,43.18 70.485,43.18 70.802,43.497 73.66,43.497 73.977,43.815 75.248,43.815 75.565,44.133 75.565,48.578 76.085,49.097 IC1400_2.10@77.117,49.097
  Top w0.254: R1317_2.2@62.865,30.545 62.865,33.052 63.558,33.745 C1328_2.1@64.135,33.745 64.135,34.483 64.5,34.848 Z1315_2.2@64.5,35.56 64.5,36.465 63.77,37.195 Z1316_2.1@63.77,38.1 63.77,39.248 63.59,39.428 63.59,40.005 63.59,41.365 64.135,41.91 C1334_2.1@64.54,41.91
SECONDARY-C15: C1327_2.1 C1332_2.2 C1333_2.1 IC1400_2.8 R1316_2.2 Z1314_2.2 Z1315_2.1 | length 35.7
  Top w0.152: C1332_2.2@61.05,41.91 61.05,42.01 61.442,42.402 61.452,42.402 61.595,42.545 64.323,42.545 64.641,42.862 65.732,42.862 66.049,43.18 68.622,43.18 68.939,43.497 70.168,43.497 70.485,43.815 73.384,43.815 73.702,44.133 74.93,44.133 75.248,44.45 75.248,49.212 76.132,50.097 IC1400_2.8@77.117,50.097
  Top w0.254: R1316_2.2@60.325,30.545 60.325,33.052 61.018,33.745 C1327_2.1@61.595,33.745 61.595,34.483 61.23,34.848 Z1315_2.1@61.23,35.56 61.23,36.465 61.96,37.195 Z1314_2.2@61.96,38.1 61.96,39.248 62.14,39.428 62.14,40.005 62.14,41.365 61.595,41.91 C1332_2.2@61.19,41.91
SECONDARY-C16: C1326_2.1 C1331_2.2 C1332_2.1 IC1400_2.6 R1315_2.2 Z1313_2.2 Z1314_2.1 | length 37.7
  Top w0.152: C1332_2.1@59.6,41.91 59.6,42.01 60.153,42.563 60.96,42.563 61.26,42.862 64.135,42.862 64.453,43.18 65.405,43.18 65.722,43.497 68.263,43.497 68.58,43.815 69.85,43.815 70.168,44.133 73.025,44.133 73.343,44.45 74.612,44.45 74.93,44.767 74.93,49.847 76.18,51.097 IC1400_2.6@77.117,51.097
  Top w0.254: R1315_2.2@57.785,30.545 57.785,33.052 58.478,33.745 C1326_2.1@59.055,33.745 59.055,34.483 59.42,34.848 Z1313_2.2@59.42,35.56 59.42,36.465 58.69,37.195 Z1314_2.1@58.69,38.1 58.69,39.248 58.51,39.428 58.51,40.005 58.51,41.365 59.055,41.91 C1332_2.1@59.46,41.91
SECONDARY-C17: C1325_2.1 C1330_2.2 C1331_2.1 IC1400_2.4 R1314_2.2 Z1312_2.2 Z1313_2.1 | length 42
  Top w0.152: C1330_2.2@55.97,41.91 55.97,42.01 56.523,42.563 59.39,42.563 59.69,42.862 60.684,42.862 61.002,43.18 63.817,43.18 64.135,43.497 65.129,43.497 65.447,43.815 67.945,43.815 68.263,44.133 69.574,44.133 69.892,44.45 72.707,44.45 73.025,44.767 74.295,44.767 74.612,45.085 74.612,50.482 76.227,52.097 IC1400_2.4@77.117,52.097
  Top w0.254: R1314_2.2@55.245,30.545 55.245,33.052 55.938,33.745 C1325_2.1@56.515,33.745 56.515,34.483 56.15,34.848 Z1313_2.1@56.15,35.56 56.15,36.465 56.88,37.195 Z1312_2.2@56.88,38.1 56.88,39.248 57.06,39.428 57.06,40.005 57.06,41.365 56.515,41.91 C1330_2.2@56.11,41.91
SECONDARY-C18: C1324_2.1 C1330_2.1 IC1400_2.2 R1313_2.2 Z1312_2.1 | length 43.6
  Top w0.152: C1330_2.1@54.52,41.91 54.52,42.01 55.073,42.563 55.898,42.563 56.197,42.862 59.055,42.862 59.372,43.18 60.325,43.18 60.642,43.497 63.5,43.497 63.817,43.815 64.77,43.815 65.087,44.133 67.627,44.133 67.945,44.45 69.215,44.45 69.532,44.767 72.39,44.767 72.707,45.085 73.977,45.085 74.295,45.402 74.295,51.117 76.275,53.097 IC1400_2.2@77.117,53.097
  Top w0.254: R1313_2.2@52.705,30.545 52.705,33.052 53.398,33.745 C1324_2.1@53.975,33.745 53.975,37.023 53.61,37.388 Z1312_2.1@53.61,38.1 53.61,41.545 53.975,41.91 C1330_2.1@54.38,41.91
SECONDARY-DIGITAL-IO_0: R700_2.1 U700_2.4 X403.1 | length 55.1
  Top w0.152: v1(43.339,37.465) 43.503,37.465 43.656,37.619 45.554,37.631 47.942,35.242 47.942,28.607 50.857,25.693 54.903,25.693 55.195,25.4 62.198,25.4 62.544,25.054 62.544,22.357 62.766,22.135 R700_2.1@63.217,22.135 ; U700_2.4@57.936,17.931 58.638,17.931 58.645,17.939 58.84,17.939 59.531,18.63 59.531,20.586 59.71,20.764 61.528,20.764 62.528,21.765 62.847,21.765 R700_2.1@63.217,22.135 ; R700_2.1@63.317,22.135 R700_2.1@63.217,22.135
  Bottom w0.152: X403.1@41.91,51.435 42.604,51.423 43.18,50.847 43.18,37.746 43.4,37.526 v1(43.339,37.465)
SECONDARY-DIGITAL-IO_1: R701_2.1 U700_2.5 X403.2 | length 51.1
  Top w0.152: v1(41.271,37.469) 41.492,37.248 42.772,37.248 43.109,36.911 45.639,36.911 47.625,34.925 47.625,28.455 50.641,25.439 54.797,25.439 55.153,25.082 60.642,25.082 60.956,24.769 60.956,22.357 61.178,22.135 R701_2.1@61.73,22.135 61.73,21.407 61.341,21.018 59.605,21.018 59.245,20.659 59.245,18.986 58.84,18.581 U700_2.5@57.936,18.581
  Bottom w0.152: v1(41.271,37.469) 40.799,37.941 40.799,48.419 41.275,48.895 X403.2@41.91,48.895
SECONDARY-DIGITAL-IO_2: R702_2.1 U700_2.6 X403.3 | length 51.9
  Top w0.152: v1(40.005,37.465) 40.481,36.989 40.481,35.401 40.74,35.142 42.346,35.142 42.446,35.242 46.672,35.242 47.307,34.608 47.307,28.316 50.439,25.185 54.597,25.185 55.017,24.765 59.039,24.765 59.369,24.435 59.369,22.357 59.591,22.135 R702_2.1@60.142,22.135 60.142,21.566 59.849,21.273 59.499,21.273 58.991,20.764 58.991,19.491 58.732,19.231 U700_2.6@57.936,19.231
  Bottom w0.152: X403.3@39.37,51.435 40.005,51.435 40.481,50.959 40.481,37.941 v1(40.005,37.465)
SECONDARY-DIGITAL-IO_3: R703_2.1 U700_2.7 X403.4 | length 48.1
  Top w0.152: v1(38.735,37.465) 38.259,36.989 38.259,35.401 38.772,34.888 42.451,34.888 42.488,34.925 46.355,34.925 46.99,34.29 46.99,28.099 50.158,24.931 54.394,24.931 54.889,24.435 57.464,24.435 57.781,24.118 57.781,22.357 58.003,22.135 R703_2.1@58.555,22.135 58.555,20.979 58.737,20.796 58.737,20.31 58.308,19.881 U700_2.7@57.936,19.881
  Bottom w0.152: v1(38.735,37.465) 38.195,38.005 38.195,48.355 38.735,48.895 X403.4@39.37,48.895
SECONDARY-DIGITAL-IO_4: R704_2.1 U700_2.9 X403.5 | length 52.4
  Top w0.152: v1(37.465,37.465) 37.941,36.989 37.941,34.449 38.1,34.29 38.1,32.703 38.417,32.385 46.355,32.385 46.672,32.067 46.672,27.94 49.936,24.677 54.206,24.677 54.765,24.118 55.876,24.118 56.194,23.8 56.194,22.357 56.416,22.135 R704_2.1@56.967,22.135 56.967,21.249 56.674,20.955 55.245,20.955 54.821,20.531 U700_2.9@52.236,20.531
  Bottom w0.152: X403.5@36.83,51.435 37.465,51.435 37.941,50.959 37.941,37.941 v1(37.465,37.465)
SECONDARY-DIGITAL-IO_5: R705_2.1 U700_2.10 X403.6 | length 49
  Top w0.152: v1(36.195,37.465) 35.719,36.989 35.719,32.544 36.131,32.131 42.037,32.131 49.745,24.423 53.984,24.423 54.606,23.8 54.606,22.357 54.828,22.135 R705_2.1@55.38,22.135 55.38,21.684 54.651,20.955 51.435,20.955 51.276,20.796 51.276,20.14 51.535,19.881 U700_2.10@52.236,19.881
  Bottom w0.152: v1(36.195,37.465) 35.719,37.941 35.719,48.419 36.195,48.895 X403.6@36.83,48.895
SECONDARY-DIGITAL-IO_6: R706_2.1 U700_2.11 X403.7 | length 50.1
  Top w0.152: v1(34.925,37.465) 35.401,36.989 35.401,32.226 35.75,31.877 41.783,31.877 49.542,24.118 52.701,24.118 52.781,24.038 53.019,23.8 53.019,22.357 53.241,22.135 R706_2.1@53.792,22.135 53.792,21.59 53.411,21.209 51.33,21.209 51.022,20.901 51.022,19.621 51.412,19.231 U700_2.11@52.236,19.231
  Bottom w0.152: X403.7@34.29,51.435 34.925,51.435 35.401,50.959 35.401,37.941 v1(34.925,37.465)
SECONDARY-DIGITAL-IO_7: R707_2.1 U700_2.12 X403.8 | length 46.4
  Top w0.152: X403.8@34.29,48.895 33.655,48.895 33.225,48.465 33.225,31.99 33.591,31.623 41.402,31.623 50.89,22.135 R707_2.1@52.205,22.135 52.205,21.684 51.984,21.463 51.225,21.463 50.768,21.007 50.768,19.348 51.535,18.581 U700_2.12@52.236,18.581
SECONDARY-GPIO1-OPT: R1408_2.1 R1425_2.1 X404.6 | length 120.6
  Top w0.152: R1408_2.1@93.093,61.119 v1(93.98,61.119)
  Top w0.203: v1@10.287,29.337 R1425_2.1@10.287,30.161
  Signals1 w0.152: X404.6@24.13,33.655 23.084,33.655 22.86,33.879 22.86,38.1 23.177,38.417 29.21,38.417 29.527,38.735 29.527,52.705 29.845,53.023 40.322,53.023 40.75,53.45 40.75,59.178 40.64,59.287 40.64,60.726 44.349,64.435 93.511,64.435 93.98,63.967 v1(93.98,61.119)
  Signals1 w0.203: v1(10.271,29.337) 12.118,29.337 15.358,32.577 23.052,32.577 X404.6@24.13,33.655
SECONDARY-GPIO2-OPT: R1410_2.1 R1426_2.1 X404.8 | length 129.4
  Top w0.152: R1410_2.1@93.143,56.515 v1(93.98,56.515)
  Top w0.203: v1@8.89,29.337 R1426_2.1@8.89,30.161
  Signals2 w0.203: v1(8.874,29.337) 9.451,29.337 10.335,28.452 14.27,28.452 14.915,29.097 14.915,29.503 15.415,30.004 17.994,30.004 18.11,29.888 18.59,29.888 19.17,30.468 19.17,31.177 21.59,33.597 X404.8@21.59,33.655
  Signals1 w0.152: X404.8@21.59,33.655 20.525,33.655 20.32,33.86 20.32,38.417 20.637,38.735 28.892,38.735 29.21,39.052 29.21,53.023 29.527,53.34 40.005,53.34 40.496,53.831 40.496,59.072 40.322,59.246 40.322,60.768 44.244,64.689 93.743,64.689 94.615,63.817 94.615,56.832 94.297,56.515 v1(93.98,56.515)
SECONDARY-GPIO3-OPT: R1412_2.1 R1427_2.1 X404.10 | length 136
  Top w0.152: R1412_2.1@93.143,53.34 v1(93.98,53.34)
  Top w0.203: v1@7.493,29.337 R1427_2.1@7.493,30.161
  Signals2 w0.203: v1(7.477,29.337) 7.477,29.702 7.874,30.099 11.356,30.099 12.698,28.757 13.178,28.757 13.589,29.168 13.589,29.972 14.293,30.676 17.114,30.676 17.911,31.474 17.911,32.262 19.177,33.528 X404.10@19.05,33.655
  Signals1 w0.152: X404.10@19.05,33.655 18.029,33.655 17.78,33.904 17.78,38.735 18.098,39.052 28.575,39.052 28.892,39.37 28.892,53.34 29.21,53.657 39.688,53.657 40.242,54.212 40.242,58.967 40.005,59.204 40.005,60.809 44.139,64.943 94.124,64.943 94.932,64.135 94.932,53.657 94.615,53.34 v1(93.98,53.34)
SECONDARY-GPIO4-OPT: R1414_2.1 X404.12 | length 125.2
  Top w0.152: R1414_2.1@93.093,50.165 93.093,50.265 93.463,50.636 93.498,50.636 v1(93.98,51.117) ; R1414_2.1@93.143,50.165 R1414_2.1@93.143,50.166
  Signals1 w0.152: X404.12@16.51,33.655 15.425,33.655 15.24,33.84 15.24,39.052 15.557,39.37 28.258,39.37 28.575,39.688 28.575,53.657 28.892,53.975 39.37,53.975 39.688,54.292 39.688,57.953 39.133,58.508 39.133,58.967 39.688,59.522 39.688,60.851 44.034,65.197 94.229,65.197 95.204,64.223 95.204,52.341 v1(93.98,51.117)
SECONDARY-GPIO5-OPT: R1416_2.1 X404.14 | length 131
  Top w0.152: R1416_2.1@93.072,46.97 93.072,47.678 93.337,47.942 v1(93.821,47.942) ; R1416_2.1@93.14,47.099 R1416_2.1@93.143,46.99
  Signals1 w0.152: X404.14@13.97,33.655 12.945,33.655 12.7,33.9 12.7,39.37 13.018,39.688 27.94,39.688 28.258,40.005 28.258,53.975 28.575,54.292 38.1,54.292 38.879,55.072 38.879,59.072 39.37,59.563 39.37,60.893 43.929,65.451 94.335,65.451 95.458,64.328 95.458,63.377 95.467,63.368 95.467,49.513 93.897,47.942 v1(93.821,47.942)
SECONDARY-GPIO6: IC1400_2.44 R1421_2.1 X405.2 | length 113.7
  Top w0.152: R1421_2.1@75.63,53.721 75.63,53.821 76.454,54.645 v1(76.454,54.737) ; IC1400_2.44@88.618,51.598 90.015,51.598 v1(90.17,51.752)
  Signals1 w0.152: X405.2@41.91,33.655 43.497,33.655 43.893,34.051 43.893,40.413 43.578,40.728 43.578,41.153 43.561,41.17 43.561,62.928 44.56,63.927 91.33,63.927 92.392,62.865 92.392,51.435 92.075,51.117 90.805,51.117 v1(90.17,51.752)
  Bottom w0.152: v1(76.454,54.737) 77.47,55.753 86.169,55.753 v1(90.17,51.752)
SECONDARY-GPIO7: IC1400_2.45 R1422_2.1 X405.4 | length 114.9
  Top w0.152: R1422_2.1@75.63,55.118 75.63,55.218 76.001,55.589 76.29,55.589 v1(76.327,55.626) ; IC1400_2.45@88.618,52.097 89.731,52.097 90.137,52.504 v1(90.65,52.504)
  Signals2 w0.152: X405.4@39.37,33.655 40.64,32.385 43.815,32.385 44.133,32.703 v1(44.133,40.957)
  Signals1 w0.152: v1(44.133,40.957) 43.815,41.275 43.815,62.547 44.941,63.673 90.949,63.673 92.075,62.547 92.075,52.938 91.641,52.504 v1(90.65,52.504)
  Bottom w0.152: v1(76.327,55.626) 76.708,56.007 87.147,56.007 v1(90.65,52.504)
SECONDARY-GPIO8: IC1400_2.46 R1423_2.1 X405.6 | length 116.1
  Top w0.152: R1423_2.1@75.63,56.515 76.327,56.515 v1(76.327,56.468) ; IC1400_2.46@88.618,52.598 89.745,52.598 90.404,53.257 v1(90.835,53.257)
  Signals2 w0.152: X405.6@36.83,33.655 38.417,32.067 44.45,32.067 44.767,32.385 v1(44.767,41.593)
  Signals1 w0.152: v1(44.767,41.593) 44.133,42.227 44.133,62.23 45.322,63.419 90.568,63.419 91.757,62.23 91.757,53.809 91.206,53.257 v1(90.835,53.257)
  Bottom w0.152: v1(76.327,56.468) 76.52,56.275 87.404,56.275 90.421,53.257 v1(90.835,53.257)
SECONDARY-GPIO9: IC1400_2.47 R1424_2.1 X405.8 | length 102.3
  Top w0.152: IC1400_2.47@88.618,53.097 89.61,53.097 v1(90.487,53.975) 90.051,53.975 89.725,54.301 R1424_2.1@89.725,54.752
  Signals2 w0.152: X405.8@34.29,33.655 36.195,31.75 45.085,31.75 45.402,32.067 v1(45.402,40.957)
  Signals1 w0.152: v1(45.402,40.957) 45.402,41.91 44.45,42.862 44.45,61.912 44.767,62.23 68.678,62.23 68.965,61.943 69.465,61.943 70.307,62.784 75.795,62.784 76.349,62.23 76.686,62.23 77.003,61.912 91.013,61.912 91.44,61.485 91.44,54.292 91.123,53.975 v1(90.487,53.975)
SECONDARY-IN+: TP1405_2.1 TR1400_2.4 X502.1 | length 17.4
  Top w0.254: TR1400_2.4@23.086,13.738 23.827,13.738 24.13,13.434 24.13,12.803 24.447,12.485 31.012,12.485 32.544,10.954 TP1405_2.1@33.387,10.954 33.387,7.144 33.713,6.818 X502.1@35,6.818
SECONDARY-IN-: TP1404_2.1 TR1400_2.6 X502.2 | length 11.9
  Top w0.254: TR1400_2.6@27.099,13.738 30.712,13.738 32.669,11.781 34.574,11.781 35,11.355 35,10.954 ; X502.2@35,9.815 35,10.954 ; TP1404_2.1@36.512,10.954 35,10.954
SECONDARY-LTC-DRIVE: IC1400_2.49 R605_2.1 R610_2.2 | length 47.3
  Top w0.152: R605_2.1@53.975,43.115 55.073,43.115 55.245,43.287 R610_2.2@55.245,45.02 55.945,45.02 v1(56.197,44.767) ; v1(78.105,54.927) 78.105,54.05 79.132,53.023 85.557,53.023 86.618,54.083 IC1400_2.49@86.618,55.547 ; IC1400_2.49@86.618,55.598 IC1400_2.49@86.653,55.562
  Signals1 w0.152: v1(56.197,44.767) 56.515,44.45 58.039,44.45 76.2,44.45 77.8,46.05 77.8,53.647 78.105,53.951 v1(78.105,54.927)
SECONDARY-MUX-DATA_TEMP: C106_2.2 R108_2.2 R1409_2.1 | length 53
  Top w0.254: R108_2.2@77.059,24.606 77.059,24.506 78.387,23.177 v1(78.74,23.177) ; C106_2.2@93.117,59.69 93.117,59.113 93.093,59.088 R1409_2.1@93.093,58.261 93.814,58.261 v1(93.833,58.281)
  Signals2 w0.254: v1(78.74,23.177) 78.74,51.752 80.04,53.052 82.262,53.052 83.185,53.975 83.185,57.053 84.839,58.708 93.406,58.708 v1(93.833,58.281)
SECONDARY-MUX-DATA_USER: C107_2.2 R109_2.2 R1411_2.1 | length 80.9
  Top w0.152: R109_2.2@26.447,58.725 28.008,58.725 C107_2.2@28.147,58.728 ; C107_2.2@28.147,58.725 28.701,58.725 28.892,58.916 28.892,59.69 v1(29.21,60.008) ; R1411_2.1@93.093,55.086 93.544,55.086 93.703,55.245 v1(93.98,55.245) v1@93.833,55.106
  Signals2 w0.152: v1(29.21,60.008) 29.527,59.69 35.369,59.69 35.543,59.863 36.212,59.863 36.877,59.199 38.647,59.199 39.247,59.8 39.797,59.8 42.227,62.23 68.678,62.23 68.965,61.943 69.465,61.943 70.307,62.784 75.795,62.784 76.349,62.23 76.686,62.23 76.923,61.993 77.7,61.993 78.173,62.467 94.196,62.467 94.932,61.73 94.932,55.562 94.615,55.245 v1(93.98,55.245)
SECONDARY-OUT+: TP1406_2.1 TR1400_2.1 X503.1 | length 16.4
  Top w0.254: TR1400_2.1@17.066,13.738 17.794,13.738 18.098,13.434 18.098,11.906 18.574,11.43 24.359,11.43 24.835,10.954 TP1406_2.1@25.717,10.954 25.717,7.144 26.043,6.818 X503.1@27.5,6.818